# Altium PCB MB_v3.PcbDoc (part 5 of 11)
Units mm, origin at the board's own origin, x right, y up, seen from the top; angles counter-clockwise.
Board outline 203 x 72 mm, 6 copper layers (Top Layer, Layer 3, Layer 1, Layer 2, Layer 4, Bottom Layer), stack 1.52 mm thick; 726 components, 608 nets, 3144 pads, 2508 vias.
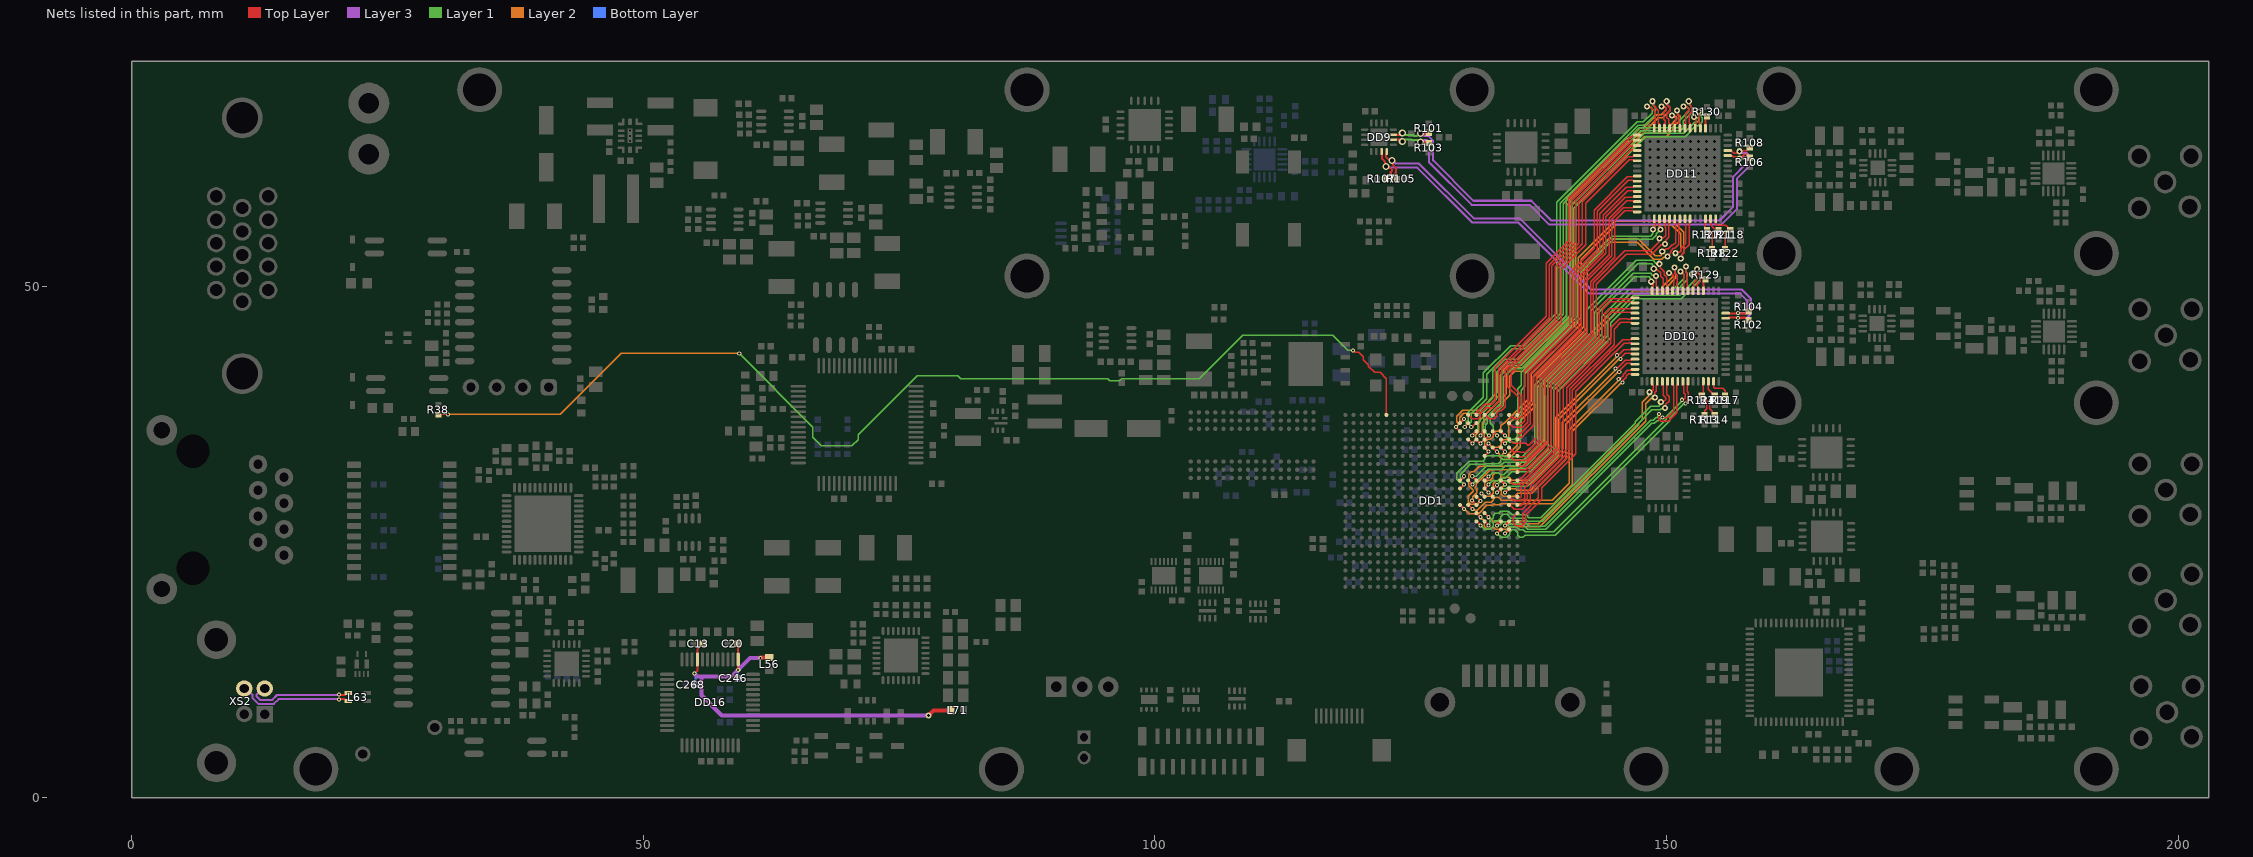
[diagram p7: the nets of this part, all layers, seen from the top]

## Via types
v1: diameter 0.8, hole 0.4, Top Layer to Bottom Layer, tented both sides, 1056 vias
v2: diameter 0.4, hole 0.2, Top Layer to Bottom Layer, tented both sides, 707 vias
v3: diameter 0.6, hole 0.3, Top Layer to Bottom Layer, tented both sides, 364 vias
v4: diameter 0.7, hole 0.4, Top Layer to Bottom Layer, tented both sides, 223 vias
v5: diameter 0.8, hole 0.4, Top Layer to Bottom Layer, 52 vias
v6: diameter 0.9, hole 0.5, Top Layer to Bottom Layer, 45 vias
v7: diameter 0.66, hole 0.4, Top Layer to Bottom Layer, 25 vias
v8: diameter 0.7, hole 0.3, Top Layer to Bottom Layer, 13 vias
v9: diameter 0.5, hole 0.2, Top Layer to Bottom Layer, 12 vias
v10: diameter 0.5, hole 0.3, Top Layer to Bottom Layer, 5 vias
v11: diameter 1, hole 0.5, Top Layer to Bottom Layer, 2 vias
v12: diameter 0.4, hole 0.2, Top Layer to Bottom Layer, 2 vias
v13: diameter 0.9, hole 0.4, Top Layer to Bottom Layer, tented both sides, 2 vias

## Nets (pads, with @x,y where several pads share a name; then routed paths per layer and width w, separated by ;. In a path a pad name is that pad's centre, name@x,y a point inside that pad or via, vN(x,y) a via of type N, cw(c..) or ccw(c..) an arc to the next point about the centre after c; other vN are vias at no path point) (continued)
ADC_MODE1: (continued)
  Top Layer w0.125: DD11.62@154.299,56.587 154.299,56.001 154.671,55.629 154.943,55.629 R121.2@155.085,55.487 155.171,55.401 155.499,55.401 155.725,55.175 155.725,53.656 R122.1@155.72,53.651
ADC_RAND0: DD10.63 R117.2 | length 2.3
  Top Layer w0.125: DD10.63@154.592,40.698 154.592,40.117 154.704,40.005 155.477,40.005 155.72,39.762 R117.2@155.72,39.312
ADC_RAND1: DD11.63 R118.2 | length 2.2
  Top Layer w0.125: DD11.63@154.799,56.587 154.799,56.123 154.973,55.95 155.766,55.95 R118.2@156.228,55.487
AGND: C13.1 C20.1 C246.1 C268.1 DD16.25 DD16.33 L56.2 L71.1 | length 43.3
  Top Layer w0.2: v2@55,12.125 55.275,12.4 DD16.33@55.275,13.525 55.275,14.512 55.615,14.852 55.615,14.855 C13.1@55.835,15.075 ; C20.1@59.185,15.075 59.275,14.985 DD16.25@59.275,13.525 v2(59.275,12.511) v2@59.275,12.5
  Top Layer w0.4: v2@61.45,13.7 L56.2@62.325,13.7 ; v3@77.875,8.05 78.375,8.55 L71.1@80.045,8.55
  Layer 3 w0.4: v2(55,12.136) 55.286,11.85 55.775,11.85 ; v2(61.45,13.675) 60.439,13.675 v2(59.275,12.511) 58.614,11.85 55.775,11.85 ; v3(77.886,8.038) 57.666,8.038 55.675,10.029 55.675,11.75 55.775,11.85
  Bottom Layer w0.2: v2(55,12.136) 55,12.082 55.11,11.972 C268.1@55.11,11.075 ; C246.1@59.235,11.7 59.275,11.74 v2(59.275,12.511)
AMP_PTT: DD1.A6 R38.1 | length 110.2
  Top Layer w0.125: R38.1@29.972,37.465 30.89,37.465 v2(30.9,37.475) ; v2(119.35,43.725) 119.398,43.725 119.561,43.563 119.925,43.563 120.362,43.125 120.362,42.805 120.862,42.305 120.862,42.178 121.465,41.575 122.003,41.575 122.612,40.966 DD1.A6@122.612,37.425
  Layer 1 w0.125: v2(59.375,43.425) 66.569,36.231 66.569,35.222 67.401,34.39 70.359,34.39 70.981,35.012 70.981,35.481 76.75,41.25 80.725,41.25 81,40.975 95.367,40.975 95.58,40.762 96.535,40.762 96.748,40.975 104.326,40.975 108.574,45.223 117.363,45.223 118.861,43.725 v2(119.35,43.725)
  Layer 2 w0.125: v2(30.9,37.475) 41.9,37.475 47.85,43.425 v2(59.375,43.425)